# Altium PCB 400390.PcbDoc (part 5 of 5)
Units mm, origin at the board's own origin, x right, y up, seen from the top; angles counter-clockwise.
Board outline 50.8 x 50.4 mm, 4 copper layers (Top Layer, Mid Layer 1, Mid Layer 2, Bottom Layer), stack 1.507 mm thick; 262 components, 210 nets, 1216 pads, 1075 vias.
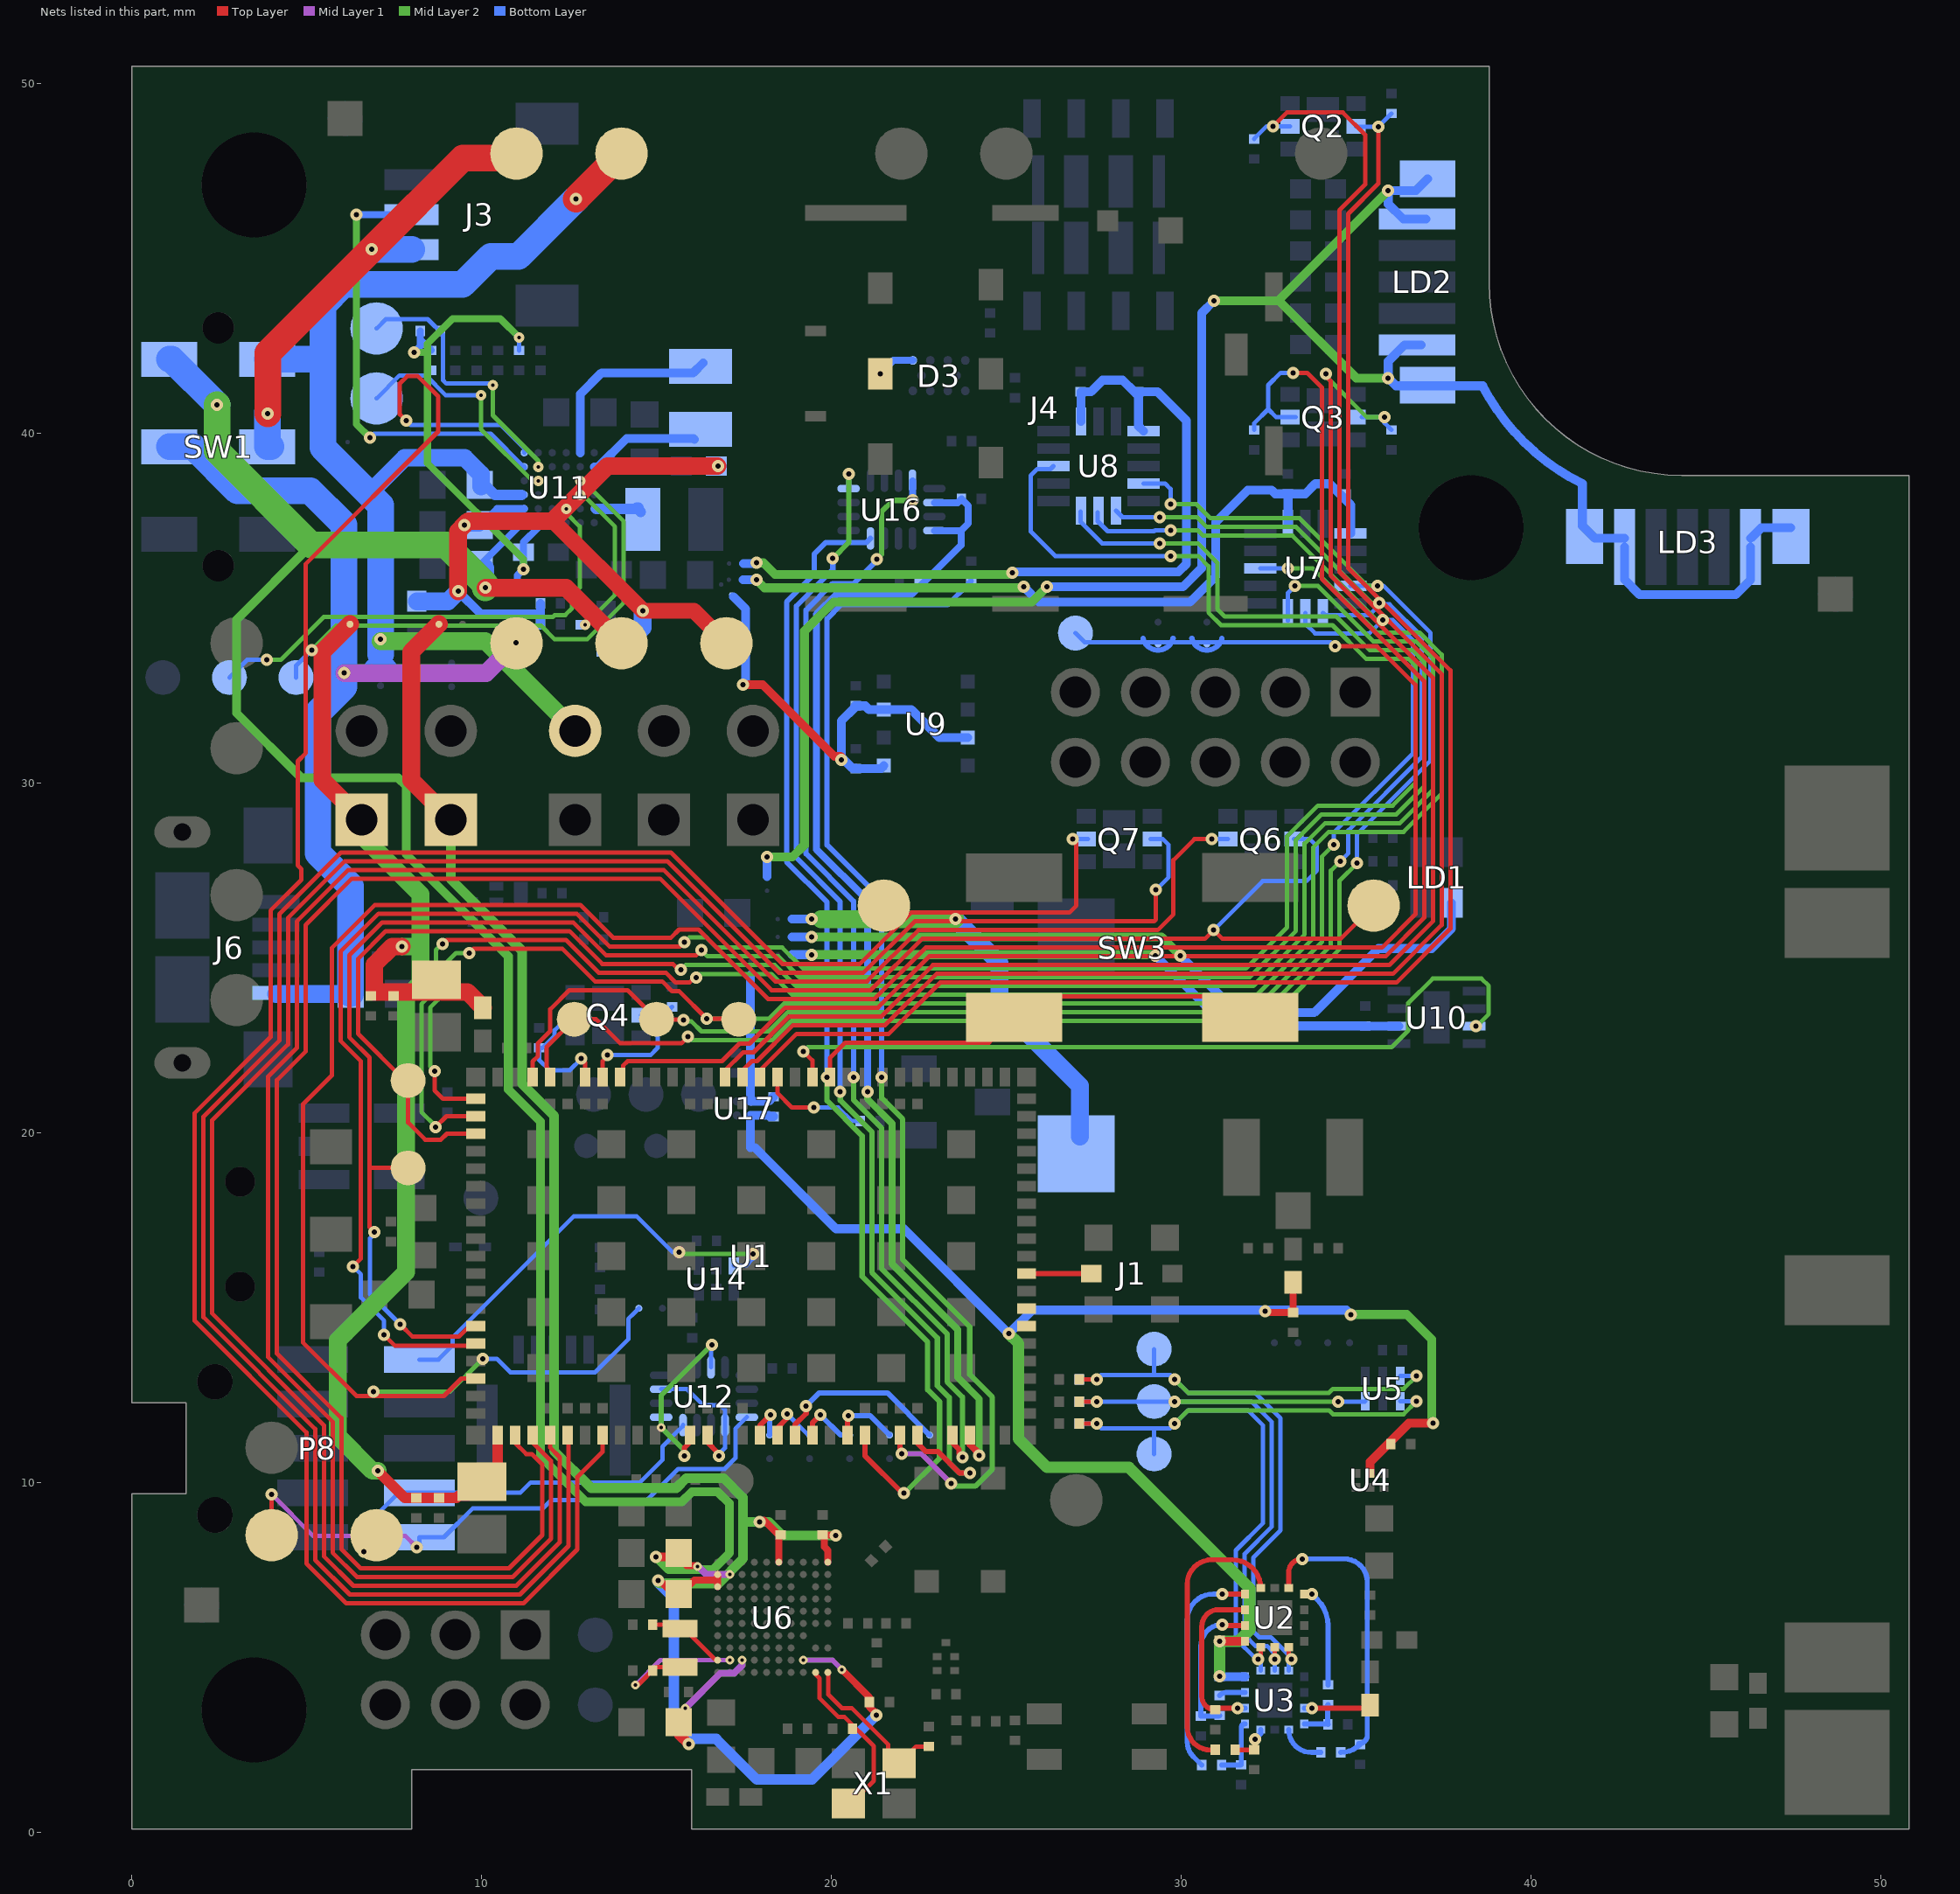
[diagram p6: the nets of this part, all layers, seen from the top]

## Via types
v1: diameter 0.35, hole 0.15, Top Layer to Bottom Layer, tented both sides, 535 vias
v2: diameter 0.35, hole 0.15, Top Layer to Mid Layer 1, tented both sides, 229 vias
v3: diameter 0.35, hole 0.15, Mid Layer 2 to Bottom Layer, tented both sides, 195 vias
v4: diameter 0.35, hole 0.15, Top Layer to Mid Layer 1, tented top, 48 vias
v5: diameter 0.25, hole 0.1, Top Layer to Mid Layer 1, tented both sides, 35 vias
v6: diameter 0.3, hole 0.1, Mid Layer 2 to Bottom Layer, tented both sides, 26 vias
v7: diameter 0.3, hole 0.1, Top Layer to Mid Layer 1, tented both sides, 3 vias
v8: diameter 0.25, hole 0.1, Mid Layer 2 to Bottom Layer, tented both sides, 2 vias
v9: diameter 0.61, hole 0.305, Top Layer to Bottom Layer, tented both sides, 2 vias

## Nets (pads, with @x,y where several pads share a name; then routed paths per layer and width w, separated by ;. In a path a pad name is that pad's centre, name@x,y a point inside that pad or via, vN(x,y) a via of type N, cw(c..) or ccw(c..) an arc to the next point about the centre after c; other vN are vias at no path point) (continued)
nRF91_SWDCLK: U1.33 U12.5 U12.11 | length 5.6
  Top Layer w0.15: v1(15.799,10.77) 15.799,10.996 15.956,11.154 U1.33@15.956,11.357
  Mid Layer 2 w0.15: v1(15.799,10.77) 15.799,10.918 v8(15.133,11.584) 15.133,12.491 v3(16.586,13.945) v3@16.637,13.945
  Bottom Layer w0.125: v8(15.133,11.584) U12.5@15.133,11.871 ; U12.11@16.558,13.296 v3@16.558,13.865
nRF91_SWDIO: U1.34 U12.1 U12.7 | length 4.1
  Top Layer w0.15: U1.34@16.456,11.357 16.456,11.154 16.761,10.849 v1@16.761,10.795
  Bottom Layer w0.125: U12.7@15.133,12.671 15.874,12.671 16.328,12.217 16.831,12.217 16.958,12.09 16.958,10.991 v1@16.761,10.795
  other v1: 16.787,10.77
P0.00: Q3.2 R44.2 U1.95 | length 45.6
  Top Layer w0.125: U1.95@13.956,21.597 14.043,21.684 14.043,21.922 14.176,22.055 16.874,22.055 17.374,22.555 17.658,22.555 18.685,23.581 21.33,23.581 22.8,25.05 35.843,25.05 36.944,26.151 36.944,32.913 34.023,35.834 34.023,41.309 33.6,41.732 v1(33.198,41.732)
  Bottom Layer w0.125: R44.2@32.09,40.097 32.09,40.294 32.487,40.691 ; v1(33.198,41.732) 32.842,41.732 32.487,41.377 32.487,40.691 ; Q3.2@33.269,40.462 Q3.2@33.106,40.462 32.715,40.462 32.487,40.691
P0.01: Q4.2 R45.2 U1.96 | length 4.1
  Top Layer w0.125: U1.96@13.456,21.597 13.456,22.048 13.602,22.194 v1(13.602,22.225)
  Bottom Layer w0.125: v1(13.602,22.225) 14.83,22.225 15.037,22.432 15.037,23.338 15.066,23.368 ; Q4.2@14.559,23.368 15.066,23.368 ; R45.2@15.448,23.606 15.21,23.368 15.066,23.368
P0.02: Q4.5 R46.2 U1.97 | length 3.9
  Top Layer w0.125: v1(12.852,22.123) 12.956,22.02 U1.97@12.956,21.597
  Bottom Layer w0.125: Q4.5@12.669,23.368 12.522,23.368 12.09,22.936 12.09,22.784 11.74,22.433 R46.2@11.653,22.433 11.653,22.078 11.938,21.793 12.522,21.793 v1(12.852,22.123)
P0.03: TP34.1 U1.99 U7.4 U8.4 | length 46.5
  Top Layer w0.125: U1.99@11.956,21.597 11.869,21.684 11.869,21.873 11.864,21.878 11.864,22.463 TP34.1@12.65,23.25 13.275,23.25 13.963,22.562 15.713,22.562 v1(15.9,22.75)
  Mid Layer 2 w0.125: v1(15.9,22.75) 15.996,22.654 18.31,22.654 18.859,23.203 32.474,23.203 34.528,25.257 34.528,27.213 v3(35.026,27.71) ; v3(29.693,37.974) 30.433,37.974 30.836,37.572 33.387,37.572 35.315,35.644 v3(35.611,35.644)
  Bottom Layer w0.125: U8.4@28.923,38.565 29.54,38.565 29.693,38.412 v3(29.693,37.974) ; U7.4@34.841,35.644 v3(35.611,35.644) 35.776,35.644 37.127,34.294 37.127,30.647 35.026,28.546 v3(35.026,27.71)
P0.04: TP35.1 U1.100 U7.6 U8.6 | length 48.4
  Top Layer w0.125: U1.100@11.456,21.597 11.456,22.042 11.613,22.199 11.613,22.567 11.963,22.917 11.963,22.964 ; 11.963,22.965 11.963,23.535 12.508,24.081 14.172,24.081 15,23.252 TP35.1@15,23.25 ; TP35.1@14.659,23.241 v1@15.723,23.241
  Mid Layer 2 w0.125: v1(15.775,23.225) 15.813,23.187 16,23.187 16.284,22.904 18.206,22.904 18.755,23.453 32.37,23.453 34.278,25.361 34.278,27.496 v3(34.544,27.762) ; v3(29.388,37.601) 30.453,37.601 30.732,37.322 33.283,37.322 35.455,35.15 v3@35.614,35.15
  Bottom Layer w0.125: U8.6@28.135,37.79 28.324,37.601 v3(29.388,37.601) ; U7.6@34.053,34.869 34.116,34.807 35.381,34.807 35.545,34.97 35.545,34.975 35.662,35.092 v3(35.662,35.153) 35.705,35.11 35.957,35.11 36.877,34.19 36.877,30.75 34.776,28.649 34.776,27.994 v3(34.544,27.762)
P0.05: TP36.1 U1.2 U7.7 U8.7 | length 56.1
  Top Layer w0.125: v1(8.661,21.768) 8.661,21.209 8.893,20.977 U1.2@9.836,20.977 ; v1(9.652,25.146) 9.774,25.268 12.306,25.268 13.244,24.331 15.164,24.331 15.446,24.049 15.651,24.049 v1(16.434,23.266) 17.334,23.266 TP36.1@17.35,23.25
  Mid Layer 2 w0.125: v1(8.661,21.768) 8.53,21.899 8.53,23.58 8.947,23.996 8.947,24.822 9.271,25.146 v1(9.652,25.146) ; v1(16.434,23.266) 18.215,23.266 18.651,23.703 32.266,23.703 34.028,25.464 34.028,27.907 v3(34.366,28.245) ; v3(29.693,37.228) 30.472,37.228 30.628,37.072 33.18,37.072 35.581,34.671
  Bottom Layer w0.125: U8.7@27.61,37.744 27.61,37.49 27.897,37.203 29.222,37.203 29.222,37.218 29.25,37.218 29.261,37.228 v3(29.693,37.228) ; U7.7@33.553,34.869 33.553,34.554 33.826,34.282 35.376,34.282 v3(35.765,34.671) 36.042,34.671 36.627,34.087 36.627,30.854 34.366,28.593 v3(34.366,28.245)
P0.06: U1.3 U7.11 | length 50.5
  Top Layer w0.125: v1(8.687,20.168) 8.996,20.477 U1.3@9.836,20.477 ; v1(8.89,25.406) 9.002,25.518 12.409,25.518 13.347,24.581 15.267,24.581 15.549,24.299 15.943,24.299 16.079,24.435 v1(16.129,24.435)
  Mid Layer 2 w0.125: v1(8.687,20.168) 8.687,20.193 8.28,20.599 8.28,23.683 8.697,24.1 8.697,25.232 8.89,25.425 v1(8.89,25.406) ; v1(16.129,24.435) 16.238,24.543 18.287,24.543 18.877,23.953 32.163,23.953 33.778,25.568 33.778,28.169 34.216,28.607 36.354,28.607 37.444,29.697 37.444,33.673 36.809,34.308 35.59,34.308 33.754,36.144 v3(33.045,36.144)
  Bottom Layer w0.125: U7.11@32.266,36.144 v3(33.045,36.144)
P0.07: TP37.1 U1.4 U7.8 | length 52.7
  Top Layer w0.125: TP37.1@7.808,21.5 6.468,22.839 6.468,24.975 7.262,25.768 12.513,25.768 13.451,24.831 15.469,24.831 15.636,24.663 v1(15.697,24.663) ; TP37.1@7.9,21.5 7.9,20.294 8.389,19.805 8.837,19.805 9.009,19.977 U1.4@9.836,19.977
  Mid Layer 2 w0.125: v1(15.697,24.663) 15.831,24.797 18.386,24.797 18.981,24.203 32.059,24.203 33.528,25.671 33.528,28.273 34.112,28.857 36.251,28.857 37.194,29.8 37.194,33.57 36.705,34.058 35.486,34.058 33.908,35.636 v3(33.249,35.636)
  Bottom Layer w0.125: U7.8@33.053,34.646 U7.8@33.053,34.869 33.053,35.441 v3(33.249,35.636)
P0.08: TP38.1 U1.15 U8.8 | length 66.6
  Top Layer w0.125: v1(6.934,17.17) 6.8,17.304 6.8,19 ; v1(7.671,14.529) 8.026,14.173 9.347,14.173 9.651,14.477 U1.15@9.836,14.477 ; TP38.1@7.9,19 6.8,19 ; v1(16.281,25.222) 16.14,25.081 13.554,25.081 12.616,26.018 7.158,26.018 6.218,25.079 6.218,22.735 6.8,22.154 6.8,19
  Mid Layer 2 w0.125: v1(16.281,25.222) 16.456,25.047 18.49,25.047 19.085,24.453 31.956,24.453 33.278,25.775 33.278,28.376 34.009,29.107 36.147,29.107 36.944,29.904 36.944,33.466 36.601,33.808 35.383,33.808 34.425,34.766 31.244,34.766 31.032,34.978 31.032,36.304 30.48,36.855 v3(29.388,36.855)
  Bottom Layer w0.125: v1(6.934,17.17) 6.934,17.11 6.81,16.986 6.81,15.389 v1(7.671,14.529) ; U8.8@27.127,37.77 27.127,37.465 27.737,36.855 v3(29.388,36.855)
P0.09: U1.16 U8.11 | length 69.3
  Top Layer w0.125: v1(6.327,16.182) 6.55,16.405 6.55,22.05 5.968,22.632 5.968,25.182 7.055,26.268 12.72,26.268 13.658,25.331 15.679,25.331 v1(15.799,25.451) ; v1(7.214,14.224) 7.518,13.919 9.778,13.919 U1.16@9.836,13.977
  Mid Layer 2 w0.125: v1(15.799,25.451) 15.933,25.585 16.432,25.585 16.719,25.297 18.593,25.297 19.188,24.703 31.852,24.703 33.028,25.878 33.028,28.48 33.905,29.357 36.044,29.357 36.694,30.007 36.694,33.363 36.498,33.558 35.279,33.558 34.322,34.516 31.141,34.516 30.782,34.874 30.782,36.2 30.489,36.493 v3(29.7,36.493)
  Bottom Layer w0.125: v1(6.327,16.182) 6.553,15.956 6.553,15.293 7.214,14.632 v1(7.214,14.224) ; U8.11@26.348,39.065 26.26,38.978 25.883,38.978 25.698,38.793 25.698,37.193 26.398,36.493 v3(29.7,36.493)
P0.10: SB5.1 SB6.1 SB14.1 TP7.1 U1.18 | length 77.3
  Top Layer w0.125: U1.18@9.836,12.977 9.421,12.977 8.921,12.477 6.426,12.477 4.903,14 4.903,20.826 5.722,21.645 5.722,21.994 5.718,21.998 5.718,25.286 6.951,26.518 12.824,26.518 13.761,25.581 15.416,25.581 15.649,25.813 16.203,25.813 18.186,23.831 21.227,23.831 22.696,25.3 35.739,25.3 36.694,26.254 36.694,32.809 35.594,33.909 v1(34.392,33.909)
  Mid Layer 2 w0.125: v1(6.909,12.598) 9.093,12.598 v3(10.033,13.538)
  Bottom Layer w0.125: v3(10.033,13.538) 10.439,13.538 10.82,13.157 13.249,13.157 14.192,14.1 14.192,14.682 14.347,14.837 SB14.1@14.496,14.986 ; TP7.1@26.975,34.29 27.233,34.032 28.948,34.032 29.726,34.032 30.345,34.032 31.123,34.032 34.269,34.032 v1(34.392,33.909)
P0.13/AIN0: Q6.2 TP32.1 U1.23 | length 67.3
  Top Layer w0.125: U1.23@10.956,11.357 10.956,11.142 11.278,10.82 11.434,10.82 11.736,10.519 11.736,8.502 10.787,7.553 6.544,7.553 5.994,8.103 5.994,11.848 4.153,13.689 4.153,21.509 4.968,22.325 4.968,25.942 6.295,27.268 15.101,27.268 18.289,24.081 21.123,24.081 22.593,25.55 30.675,25.55 v1(30.925,25.8) 31.175,25.55 34.55,25.55 TP32.1@35.5,26.5
  Bottom Layer w0.125: v1(30.925,25.8) 32.325,27.2 33.575,27.2 33.875,27.5 33.875,28.2 33.675,28.4 Q6.2@33.22,28.4
P0.14/AIN1: Q6.5 U1.24 | length 60.4
  Top Layer w0.125: U1.24@11.456,11.357 11.456,11.152 11.986,10.622 11.986,8.398 10.891,7.303 6.44,7.303 5.744,7.999 5.744,11.744 3.903,13.586 3.903,21.613 4.718,22.428 4.718,26.046 6.191,27.518 15.205,27.518 18.393,24.331 21.02,24.331 22.489,25.8 29.325,25.8 29.775,26.25 29.775,27.8 30.375,28.4 v1(30.875,28.4)
  Bottom Layer w0.125: v1(30.875,28.4) Q6.5@31.33,28.4
P0.15/AIN2: Q7.2 U1.25 | length 61.6
  Top Layer w0.125: U1.25@11.956,11.357 11.956,11.006 12.236,10.726 12.236,8.295 10.994,7.053 6.337,7.053 5.494,7.895 5.494,11.641 2.3,14.835 2.3,20.363 4.468,22.532 4.468,26.149 6.088,27.768 15.308,27.768 18.496,24.581 20.916,24.581 22.385,26.05 29.221,26.05 29.275,26.104 v1(29.275,26.95)
  Bottom Layer w0.125: Q7.2@29.12,28.4 Q7.2@29.17,28.4 29.475,28.4 29.638,28.238 29.638,27.313 v1(29.275,26.95)
P0.16/AIN3: Q7.5 TP33.1 U1.26 | length 60
  Top Layer w0.125: U1.26@12.456,11.357 12.486,11.327 12.486,8.191 11.098,6.803 6.233,6.803 5.244,7.792 5.244,11.537 2.05,14.732 2.05,20.467 4.218,22.636 4.218,26.253 5.984,28.018 15.412,28.018 18.6,24.831 20.812,24.831 22.282,26.3 26.8,26.3 27,26.5 27,28.275 v1@26.875,28.4
  Bottom Layer w0.125: v1@26.875,28.4 v1(26.9,28.4) Q7.5@27.28,28.4 Q7.5@27.33,28.4
P0.17/AIN4: U1.28 U11.A6 | length 56.5
  Top Layer w0.125: v1(7.849,40.361) 7.664,40.545 7.664,41.425 7.876,41.638 8.177,41.638 8.759,41.055 8.759,40.051 4.978,36.271 4.978,30.859 4.747,30.628 4.747,27.647 4.853,27.541 4.853,27.24 3.968,26.356 3.968,22.739 1.8,20.571 1.8,14.628 4.994,11.434 4.994,7.688 6.13,6.553 11.201,6.553 12.736,8.088 12.736,10.159 13.456,10.879 U1.28@13.456,11.357
  Bottom Layer w0.125: v1(7.849,40.361) 7.97,40.239 10.555,40.239 11.221,39.573 U11.A6@11.221,39.446
P0.21: SB7.2 U1.37 | length 1.3
  Top Layer w0.152: U1.37@17.956,11.357 17.956,11.636 v1(18.261,11.941)
  Bottom Layer w0.152: SB7.2@18.235,11.361 18.235,11.916 v1(18.261,11.941)
P0.22: SB8.2 U1.38 | length 1.6
  Top Layer w0.152: U1.38@18.456,11.357 18.456,11.562 18.735,11.841 v1(18.735,11.967)
  Bottom Layer w0.125: v1(18.735,11.967) 19.341,11.361 SB8.2@19.378,11.361
P0.23: SB9.2 U1.39 | length 5.2
  Top Layer w0.152: U1.39@18.956,11.357 18.956,11.655 19.279,11.978 v1(19.279,12.192) v1@19.279,12.217
  Bottom Layer w0.152: v1(19.279,12.192) 19.655,12.568 21.6,12.568 SB9.2@22.807,11.361
P0.24: SB10.2 U1.40 | length 1.8
  Top Layer w0.152: U1.40@19.456,11.357 19.456,11.709 v1(19.685,11.938)
  Bottom Layer w0.152: v1(19.685,11.938) 20.262,11.361 SB10.2@20.521,11.361
P0.25: SB11.2 U1.42 | length 2
  Top Layer w0.152: U1.42@20.456,11.357 20.456,11.89 v1(20.481,11.916)
  Bottom Layer w0.152: v1(20.481,11.916) 21.109,11.916 SB11.2@21.664,11.361
P0.26: SW3.2 U1.83 | length 13.5
  Top Layer w0.125: U1.83@19.956,21.597 19.956,22.14 20.396,22.581 24.506,22.581 25.826,23.901 31.374,23.901 SW3.2@31.975,23.3
P0.27: U1.84 U10.7 | length 23.1
  Top Layer w0.125: v1(19.202,22.326) 19.456,22.072 U1.84@19.456,21.597
  Mid Layer 2 w0.125: v1(19.202,22.326) 19.328,22.453 36.016,22.453 36.487,22.924 36.487,23.711 37.189,24.412 38.582,24.412 38.788,24.206 38.788,23.4 38.438,23.05 v3(38.426,23.05)
P0.28: R21.2 U1.86 | length 3.2
  Top Layer w0.125: U1.86@18.456,21.597 18.456,21.143 18.874,20.725 v1(19.5,20.725)
  Bottom Layer w0.125: v1(19.5,20.725) 20.194,20.725 20.574,20.345 R21.2@20.822,20.345
P0.29: Q2.5 R41.2 U1.87 | length 47.3
  Top Layer w0.125: U1.87@17.956,21.597 U1.87@17.956,21.782 ; U1.87@17.956,21.791 U1.87@17.956,21.782 ; v3(35.636,48.768) 35.636,47.142 34.773,46.279 34.773,36.144 37.694,33.223 37.694,25.84 36.154,24.3 23.11,24.3 21.641,22.831 19.004,22.831 U1.87@17.956,21.782
  Bottom Layer w0.125: Q2.5@34.996,48.781 35.009,48.768 v3(35.636,48.768) 35.636,48.77 R41.2@36.012,49.146
  other v1: 35.636,48.768
P0.30: Q2.2 R42.2 U1.88 | length 50.2
  Top Layer w0.125: U1.88@17.456,21.597 17.456,21.782 17.728,22.055 17.875,22.055 18.901,23.081 21.537,23.081 23.007,24.55 36.05,24.55 37.444,25.944 37.444,33.12 34.523,36.041 34.523,46.382 35.255,47.115 35.255,48.539 34.62,49.174 33.02,49.174 v1(32.626,48.781)
  Bottom Layer w0.125: R42.2@32.08,48.418 32.443,48.781 v1(32.626,48.781) Q2.2@33.106,48.781
P0.31: Q3.5 R43.2 U1.89 | length 42.5
  Top Layer w0.125: U1.89@16.956,21.597 16.956,21.783 17.478,22.305 17.771,22.305 18.797,23.331 21.434,23.331 22.903,24.8 35.946,24.8 37.194,26.047 37.194,33.016 34.273,35.937 34.273,41.496 v1@34.061,41.707
  Mid Layer 2 w0.125: v1@34.061,41.707 35.306,40.462 v3(35.814,40.462)
  Bottom Layer w0.125: Q3.5@35.159,40.462 v3(35.814,40.462) 35.814,40.295 R43.2@36.012,40.097
  other v1: 34.138,41.707
PGOOD1: R27.2 TP20.1 U11.B5 | length 7.8
  Mid Layer 2 w0.125: v6(10.323,41.374) 10.323,40.514 11.621,39.216 v6(11.621,39.046)
  Bottom Layer w0.125: TP20.1@7,43 7.264,43.264 8.462,43.264 8.903,42.823 8.903,41.516 8.994,41.425 10.272,41.425 v6(10.323,41.374)
PGOOD2: R28.2 TP21.1 U11.C5 | length 6.7
  Mid Layer 2 w0.125: v6(9.985,41.088) 9.985,40.111 11.45,38.646 v6(11.621,38.646)
  Bottom Layer w0.125: TP21.1@7,41 7.656,41.656 8.409,41.656 8.978,41.088 v6(9.985,41.088)
R\E\S\E\T\: TP23.1 U11.E3 | length 13.7
  Mid Layer 2 w0.125: v3(3.861,33.528) 4.265,33.528 5.488,34.751 12.035,34.751 12.09,34.806 12.391,34.806 12.589,35.004 12.589,35.373 12.805,35.589 12.805,37.336 12.421,37.72 v6(12.421,37.846)
  Bottom Layer w0.125: TP23.1@2.794,33.02 3.302,33.528 v3(3.861,33.528)
RESET: P8.10 U14.3 | length 12.6
  Mid Layer 2 w0.125: v3(15.646,16.586) 15.697,16.535 v3(17.755,16.535)
  Bottom Layer w0.125: P8.10@8.225,13.52 8.77,13.52 9.169,13.919 9.169,14.146 12.633,17.609 14.44,17.609 15.463,16.586 v3(15.646,16.586) ; U14.3@17.213,16.199 17.545,16.199 17.755,16.408 v3(17.755,16.535)
RF: J1.1 U1.61 | length 1.9
  Top Layer w0.146: U1.61@25.576,15.977 J1.1@27.429,15.977
RF_SW1: R1.2 R6.2 TP2.1 U2.7 U3.7 U5.6 | length 23.9
  Top Layer w0.125: R1.2@27.082,12.954 v1(27.584,12.954) ; U2.7@33.071,5.299 33.071,5.033 v1(33.147,4.957)
  Mid Layer 2 w0.125: v3(29.812,12.954) 30.197,12.569 34.222,12.569 34.335,12.682 36.357,12.682 v3(36.725,13.05)
  Bottom Layer w0.125: R6.2@27.082,12.954 v1(27.584,12.954) 27.711,13.081 29.225,13.081 ; TP2.1@29.225,13.819 29.225,13.081 ; 32.111,12.569 30.197,12.569 v3(29.812,12.954) 29.685,13.081 29.225,13.081 ; 32.111,12.569 32.839,11.841 32.839,8.639 32.059,7.858 32.059,5.743 32.221,5.581 32.559,5.581 33.147,4.993 v1(33.147,4.957) 33.071,4.88 U3.7@33.071,4.626 ; U5.6@36.258,13.051 U5.6@36.258,13.051 v3(36.725,13.05)
RF_SW2: R2.2 R5.2 TP3.1 U2.6 U3.6 U5.3 | length 20
  Top Layer w0.125: R2.2@27.082,12.319 v1(27.584,12.319) ; v1(32.671,4.957) U2.6@32.671,5.299
  Mid Layer 2 w0.125: v3(29.812,12.319) v3(34.485,12.319)
  Bottom Layer w0.125: R5.2@27.082,12.319 v1(27.584,12.319) TP3.1@29.225,12.319 32.008,12.319 32.589,11.738 32.589,8.742 31.809,7.961 31.809,5.64 32.117,5.331 32.456,5.331 32.671,5.116 v1(32.671,4.957) U3.6@32.671,4.626 ; v3(34.485,12.319) 35.251,12.319 U5.3@35.258,12.326
RF_SW3: R3.2 R4.2 TP4.1 U2.5 U3.5 U5.1 | length 22.7
  Top Layer w0.125: R3.2@27.082,11.684 v1(27.584,11.684) ; v1(32.195,4.957) 32.271,5.033 U2.5@32.271,5.299
  Mid Layer 2 w0.125: v3(29.812,11.684) 30.197,12.069 34.222,12.069 34.335,11.956 36.355,11.956 v3(36.724,12.326)
  Bottom Layer w0.125: R4.2@27.082,11.684 v1(27.584,11.684) 27.711,11.557 29.225,11.557 ; TP4.1@29.225,10.819 29.225,11.557 ; U3.5@32.271,4.626 32.271,4.88 v1(32.195,4.957) 32.138,4.957 31.559,5.536 31.559,8.065 32.339,8.846 32.339,11.634 31.905,12.069 30.196,12.069 v3(29.812,11.684) 29.685,11.557 29.225,11.557 ; U5.1@36.258,12.326 v3(36.724,12.326)
RST: D3.C1 J4.C2 | length 1.1
  Bottom Layer w0.203: v1(21.394,41.708) 21.772,42.086 D3.C1@22.328,42.086
SCLK: U1.58
SDATA: U1.59 | length 0
SIM_1V8: C34.2 R49.2 U1.49 U16.14 U16.16 | length 34.7
  Top Layer w0.2: U1.49@23.956,11.357 23.956,11.094 v1@24.25,10.8
  Mid Layer 2 w0.2: v3(21.031,21.184) 21.031,20.972 21.735,20.268 21.735,16.251 23.608,14.378 23.608,13.011 24.225,12.395 v1(24.225,10.775)
  Bottom Layer w0.2: v3(21.031,21.184) 21.032,26.65 19.576,28.106 19.576,34.824 20.155,35.404 22.303,35.404 23.708,36.808 23.708,37.221 ; U16.16@22.942,37.221 23.708,37.221 ; U16.14@22.942,38.021 23.613,38.021 C34.2@23.718,38.125 23.91,37.934 23.91,37.423 23.708,37.221
SIM_CLK: U1.46 U16.8 | length 34
  Top Layer w0.152: U1.46@22.456,11.357 22.456,11.139 22.709,10.886 23.05,10.886 23.662,10.274 v1(23.957,10.274) ; v1@23.957,10.325 v1@24.008,10.325
  Mid Layer 2 w0.152: v3(20.041,36.424) 20.498,36.881 v3(20.498,38.837) ; v3(20.253,21.184) 20.253,20.932 21.156,20.029 21.156,16.012 23.03,14.138 23.03,12.772 23.368,12.433 23.368,10.568 23.662,10.274 v1(23.957,10.274) ; v1@23.957,10.325 v1@24.008,10.325
  Bottom Layer w0.152: v3(20.041,36.424) 20.041,36.107 18.997,35.064 18.997,27.866 20.25,26.613 v3@20.25,21.184 ; U16.8@20.492,38.421 20.498,38.426 v3(20.498,38.837)
SIM_DET: R52.2 U1.45 | length 34.6
  Top Layer w0.152: U1.45@21.956,11.357 21.956,10.915 v2@22.047,10.824
  Mid Layer 1 w0.152: v2(22.015,10.824) 22.577,10.824 v1(23.419,9.982)
  Mid Layer 2 w0.152: v3(21.438,21.59) 21.438,20.991 22.036,20.393 22.036,16.376 23.954,14.458 23.954,13.092 24.601,12.445 24.601,10.386 24.113,9.898 23.503,9.898 v1(23.419,9.982)
  Bottom Layer w0.152: v3(21.438,21.59) 21.438,26.67 19.877,28.231 19.877,34.7 20.28,35.103 23.323,35.103 23.921,35.701 23.921,35.716 23.98,35.775 R52.2@23.995,35.775
SIM_IO: U1.48 U16.12 | length 32.3
  Top Layer w0.152: U1.48@23.456,11.357 23.456,11.144 23.643,10.957 v1@23.643,10.825
  Mid Layer 2 w0.152: v3(20.632,21.59) 20.632,20.945 21.434,20.143 21.434,16.127 23.307,14.253 23.307,12.887 23.745,12.449 v1(23.745,10.723) ; v3(21.295,36.402) 21.433,36.54 21.433,37.757 21.76,38.084 v3(22.317,38.084)
  Bottom Layer w0.152: v3(20.632,21.59) 20.632,26.624 19.275,27.981 19.275,34.949 20.031,35.705 20.643,35.705 21.295,36.357 v3(21.295,36.402)
  Bottom Layer w0.2: v3(22.317,38.084) U16.12@22.317,38.646
SIM_RST: U1.43 U16.4 | length 33.5
  Top Layer w0.152: U1.43@20.956,11.357 20.956,10.77 22.023,9.703 v1(22.073,9.703)
  Mid Layer 2 w0.152: v3(19.874,21.59) v3@19.874,21.488 ; v3@19.976,21.59 v3@19.874,21.488 ; v1(22.073,9.703) 22.096,9.703 23.091,10.698 23.091,12.318 22.752,12.657 22.752,14.023 20.879,15.897 20.879,19.914 19.874,20.918 v3@19.874,21.488
  Bottom Layer w0.152: v3(19.874,21.59) 19.874,26.597 18.72,27.751 18.72,35.179 19.507,35.966 19.507,36.551 19.837,36.881 21.002,36.881 U16.4@21.117,36.996
STP: TP22.1 U11.C2 | length 14.8
  Mid Layer 2 w0.125: v3(5.147,33.807) 5.841,34.501 11.701,34.501 12.082,34.121 13.026,34.121 14.064,35.158 14.064,37.48 12.898,38.646 v6(12.821,38.646)
  Bottom Layer w0.125: TP22.1@4.699,33.02 4.699,33.359 v3(5.147,33.807)
SW1: L13.1 U11.E1 | length 1.4
  Bottom Layer w0.3: U11.E1@13.271,37.846 L13.1@14.431,37.846 ; L13.1@14.481,37.871 14.431,37.871 L13.1@14.551,37.751
SW2A: L14.1 U11.B1 | length 3.2
  Bottom Layer w0.254: U11.B1@13.225,39.036 13.331,39.036 14.148,39.853 16.059,39.853 L14.1@16.081,39.83
SW2B: L14.2 U11.A2 | length 5.6
  Bottom Layer w0.152: U11.A2@12.802,39.443 U11.A2@12.802,39.446
  Bottom Layer w0.25: U11.A2@12.821,39.446 12.821,41.123 13.43,41.732 16.053,41.732 L14.2@16.332,42.012
SWDCLK: P8.4 TP29.1 U12.4 | length 11.3
  Bottom Layer w0.125: v1(6.629,8.026) 6.629,8.712 7.627,9.71 P8.4@8.225,9.71 11.107,9.71 11.405,10.008 14.529,10.008 15.168,10.647 15.168,11.028 15.758,11.617 U12.4@15.758,11.646
SWDIO: P8.2 TP27.1 U12.16 | length 17.8
  Top Layer w0.125: TP27.1@4,8.192 TP27.1@4,8.5 v2(4,9.665)
  Mid Layer 1 w0.125: v2(4,9.665) 5.182,8.484 7.819,8.484 v1(8.149,8.153)
  Bottom Layer w0.125: P8.2@8.225,8.179 P8.2@8.225,8.44 8.923,8.44 9.754,9.271 11.76,9.271 11.997,9.508 14.736,9.508 15.617,10.389 16.942,10.389 17.256,10.703 17.256,11.545 U12.16@17.583,11.871
T1A: L7.2 R10.1 U3.14 | length 1.2
  Top Layer w0.146: R10.1@31.539,2.359 32.098,2.359 32.112,2.373 v1(32.112,2.664)
  Bottom Layer w0.146: v1(32.112,2.664) 32.271,2.823 U3.14@32.271,2.936
T1F: R10.2 U2.14 | length 8.2
  Top Layer w0.146: R10.2@30.969,2.359 30.831,2.359 cw(c30.831,3.019) 30.171,3.019 30.171,7.098 cw(c30.868,7.098) 30.868,7.795 31.465,7.795 cw(c31.465,6.989) U2.14@32.271,6.989
T2A: C10.1 L6.2 U3.1 | length 1.8
  Bottom Layer w0.146: C10.1@31.153,1.927 31.7,1.927 L6.2@31.706,1.933 ; L6.2@31.706,1.933 ccw(c31.679,1.96) 31.717,1.96 31.717,2.997 cw(c31.826,2.997) U3.1@31.826,3.106
T2F: C10.2 U2.1 | length 6.4
  Top Layer w0.146: v1(31.172,6.819) U2.1@31.826,6.819
  Bottom Layer w0.146: C10.2@30.583,1.927 30.346,2.163 cw(c30.77,2.588) 30.171,2.588 30.171,6.067 cw(c30.922,6.067) 30.922,6.819 v1(31.172,6.819)
T3F: C12.2 U2.2 U3.2 | length 5
  Top Layer w0.146: v1(31.608,3.556) 31.018,3.556 ccw(c31.018,3.508) C12.2@30.969,3.508 cw(c30.969,3.889) 30.588,3.889 30.588,5.89 cw(c31.067,5.89) 31.067,6.369 U2.2@31.826,6.369
  Bottom Layer w0.146: v1(31.608,3.556) U3.2@31.826,3.556
T4A: C9.1 U3.3 | length 0.8
  Bottom Layer w0.146: C9.1@31.096,3.914 cw(c31.319,3.691) 31.203,3.984 cw(c31.319,3.691) 31.319,4.006 U3.3@31.826,4.006
T4F: C9.2 L4.2 U2.3 | length 4.2
  Top Layer w0.146: v1@31.172,5.919 U2.3@31.826,5.919
  Bottom Layer w0.146: C9.2@31.096,3.344 cw(c31.062,3.378) 31.062,3.33 L4.2@30.563,3.33 30.563,5.334 cw(c31.172,5.334) v1(31.172,5.944)
T5A: C11.1 U3.12 | length 1.3
  Bottom Layer w0.146: U3.12@33.071,2.936 ccw(c33.721,2.936) 33.721,2.287 C11.1@33.989,2.287
T5F: C11.2 L5.2 U2.12 | length 8.7
  Top Layer w0.146: U2.12@33.071,6.989 33.071,7.433 cw(c33.458,7.433) v1(33.458,7.82)
  Bottom Layer w0.146: v1(33.458,7.82) 34.66,7.82 cw(c34.66,7.161) 35.318,7.161 35.318,2.78 cw(c35.075,2.78) L5.2@35.075,2.537 ; C11.2@34.559,2.287 ccw(c34.559,3.067) 35.111,2.515 L5.2@35.113,2.517
T6A: C14.2 R9.1 U3.11 | length 1.2
  Bottom Layer w0.146: U3.11@33.516,3.106 34.179,3.106 C14.2@34.189,3.096 ; C14.2@34.195,3.09 C14.2@34.189,3.096 ; R9.1@34.195,3.649 34.189,3.643 C14.2@34.189,3.096
T6F: R9.2 U2.11 | length 3
  Top Layer w0.146: U2.11@33.516,6.819 v1(33.734,6.819)
  Bottom Layer w0.146: v1(33.734,6.819) 33.882,6.671 cw(c33.126,5.915) 34.195,5.915 R9.2@34.195,4.219
T7A: L3.2 U3.10 | length 1.9
  Top Layer w0.146: v1(33.734,3.556) L3.2@35.395,3.556
  Bottom Layer w0.146: U3.10@33.516,3.556 v1(33.734,3.556)
THR: J3.2 U11.B6 | length 13.2
  Mid Layer 2 w0.2: v3(6.426,46.253) 6.426,40.259 v3(6.807,39.878)
  Bottom Layer w0.125: v3(6.807,39.878) 6.918,39.989 10.264,39.989 11.207,39.046 U11.B6@11.221,39.046
  Bottom Layer w0.152: U11.B6@11.207,39.046 11.193,39.046 U11.B6@11.218,39.021
  Bottom Layer w0.2: v3(6.426,46.253) J3.2@8.153,46.253
VBUS: C33.1 C53.2 SW1.3 TP12.1 U6.J9 U11.F6 | length 64.1
  Top Layer w0.2: C33.1@15.638,7.86 15.866,7.631 v5@16.17,7.631
  Top Layer w0.254: v1(14.986,7.874) 15.623,7.874 C33.1@15.638,7.86
  Top Layer w0.508: v1(10.109,35.585) 12.415,35.585 TP12.1@14,34
  Mid Layer 1 w0.2: v5@16.17,7.631 16.425,7.376 v5(17.097,7.376)
  Mid Layer 2 w0.254: 5.131,36.805 2.997,34.671 2.997,32.004 4.851,30.15 7.62,30.15 7.849,29.921 7.849,27.965 10.768,25.046 10.768,21.241 11.684,20.324 11.684,10.744 12.973,9.455 15.729,9.455 16.011,9.737 16.755,9.737 17.084,9.408 17.084,7.986 16.61,7.512 15.348,7.512 v1(14.986,7.874)
  Mid Layer 2 w0.762: v1(2.438,40.818) 2.438,39.497 5.131,36.805 8.992,36.805 10.109,35.687 v1(10.109,35.585)
  Bottom Layer w0.203: C53.2@9.949,36.236 C53.2@9.965,36.236 ; C53.2@9.957,36.228 C53.2@9.965,36.236 ; C53.2@10.067,36.236 C53.2@9.965,36.236 ; U11.F6@11.221,37.446 11.175,37.446 C53.2@9.965,36.236
  Bottom Layer w0.508: v1(10.109,35.585) C53.2@10.109,36.152
  Bottom Layer w0.762: SW1.3@1.075,42.12 1.136,42.12 v1(2.438,40.818)
  other v5: 16.17,7.606
VBUS': C43.1 C44.1 J6.1 SW1.2 TP11.1 | length 27.4
  Mid Layer 1 w0.508: v1(6.071,33.147) 10.126,33.147 v2(10.989,34.011)
  Bottom Layer w0.508: J6.1@4.125,23.975 C43.1@6.237,23.975
  Bottom Layer w0.762: SW1.2@1.075,39.62 1.757,39.62 3.023,38.354 5.105,38.354 6.071,37.389 v1(6.071,33.147) 6.071,32.764 5.323,32.016 5.323,27.996 6.256,27.063 6.259,27.063 C43.1@6.259,23.978
VDD: C52.2 R27.1 R28.1 R33.2 R34.1 U11.F5 | length 14.6
  Mid Layer 2 w0.203: v3(8.077,42.316) 8.428,42.316 8.453,42.342 ; v6(11.078,42.739) 10.535,43.282 9.169,43.282 8.453,42.566 8.453,42.342 ; v3(11.201,36.119) 11.201,36.398 8.453,39.146 8.453,42.342
  Bottom Layer w0.125: R33.2@11.078,42.369 v6(11.078,42.739)
  Bottom Layer w0.203: v3(8.077,42.316) 8.249,42.489 8.249,42.683 ; R27.1@8.249,42.926 8.249,42.683 ; R28.1@8.56,42.373 8.249,42.683 ; R34.1@11.018,35.687 11.018,35.935 v3(11.201,36.119) 11.201,36.6 11.201,36.888 11.621,37.308 U11.F5@11.621,37.446
VDD_ADXL362: C38.2 C39.2 ST8.2 U8.1 U8.14 | length 22.7
  Mid Layer 2 w0.254: v3(17.856,36.297) 18.059,36.297 18.392,35.964 25.119,35.964 v3(25.171,36.017)
  Bottom Layer w0.254: ST8.2@17.483,36.279 v3@17.818,36.279 ; v3@25.171,36.043 29.921,36.043 30.15,36.271 30.15,40.361 29.317,41.193 C39.2@28.778,41.193 C39.2@28.651,41.193 ; U8.14@27.135,40.34 C38.2@27.135,41.185 ; C38.2@27.135,41.193 27.426,41.193 27.754,41.521 28.323,41.521 C39.2@28.651,41.193 ; U8.1@28.923,40.065 28.778,40.21 28.778,41.066 C39.2@28.651,41.193
VDD_ADXL372: C36.2 C37.2 ST7.2 U7.1 U7.14 | length 22
  Mid Layer 2 w0.254: v3(17.856,35.814) 18.085,35.585 25.476,35.585 v3(25.502,35.611)
  Bottom Layer w0.254: ST7.2@17.475,35.814 v3(17.856,35.814) ; v3(25.502,35.611) 25.933,35.179 30.251,35.179 30.988,35.916 30.988,37.465 31.898,38.375 32.587,38.375 32.69,38.272 C36.2@33.045,38.272 ; U7.14@33.053,37.419 33.053,38.264 C36.2@33.045,38.272 ; U7.1@34.841,37.144 34.841,37.955 34.239,38.557 33.833,38.557 33.548,38.272 C36.2@33.045,38.272
VDD_BH: C42.2 ST2.2 U10.2 | length 18.2
  Mid Layer 2 w0.254: v3(19.431,25.095) 29.235,25.095 v3(29.261,25.07)
  Bottom Layer w0.254: ST2.2@18.872,25.095 v3(19.431,25.095) ; v3(29.261,25.07) 31.273,23.058 C42.2@35.255,23.058 ; C42.2@35.255,23.05 U10.2@36.225,23.05
VDD_BME: C40.2 C41.2 ST9.2 U9.2 U9.6 U9.8 | length 13
  Top Layer w0.254: v1(17.475,32.817) 18.035,32.817 20.086,30.765 20.264,30.765 v1@20.282,30.747
  Bottom Layer w0.254: 17.196,35.331 17.551,34.976 17.551,32.893 v1(17.475,32.817) ; U9.8@21.5,30.5 21.415,30.415 C41.2@20.7,30.415 20.692,30.423 20.606,30.423 20.282,30.747 20.282,31.779 20.677,32.173 20.677,32.207 20.685,32.215 C40.2@20.7,32.215 20.708,32.207 20.968,32.207 21.075,32.1 U9.6@21.5,32.1 22.289,32.1 23.089,31.3 U9.2@23.9,31.3
  other v1: 20.282,30.671
VDD_BZR: Bz1.1 D2.1 ST5.2 | length 12.8
  Mid Layer 2 w0.254: v3(19.431,26.111) 19.706,26.111
  Mid Layer 2 w0.508: 19.706,26.111 v3(23.546,26.111)
  Bottom Layer w0.254: ST5.2@18.872,26.111 v3(19.431,26.111) ; D2.1@24.8,23.222 D2.1@24.8,23.65
  Bottom Layer w0.508: v3(23.546,26.111) 24.8,24.857 24.8,23.65 27.1,21.35 Bz1.1@27.1,19.9
VDD_LW: LD2.1 LD2.2 LD2.6 LD3.1 LD3.2 LD3.6 ST4.2 | length 59.2
  Mid Layer 2 w0.254: v3(18.161,27.889) 18.887,27.889 19.228,28.23 19.228,34.346 20.061,35.179 25.73,35.179 v3(26.162,35.611) ; v3(30.937,43.79) 32.766,43.79 ; v3(35.916,41.58) 35.001,41.58 32.791,43.79 32.766,43.79 ; v3(35.916,46.939) 32.766,43.79
  Bottom Layer w0.254: ST4.2@18.161,27.33 v3(18.161,27.889) ; v3(26.162,35.611) 30.048,35.611 30.582,36.144 30.582,43.434 v3(30.937,43.79) ; LD2.6@36.864,42.528 36.381,42.528 35.916,42.062 v3(35.916,41.58) 36.138,41.358 38.616,41.358 ccw(c44.3,44.3) 41.467,38.56 41.467,37.358 41.825,37 LD3.2@42.675,37 ; LD2.2@36.992,46.128 36.346,46.128 35.916,46.558 v3(35.916,46.939) 36.703,46.939 LD2.1@37.042,47.278 ; LD3.2@42.675,36.75 42.675,35.815 43.104,35.386 45.847,35.386 46.275,35.814 LD3.6@46.275,36.75 ; LD3.6@46.275,37 46.575,37.3 LD3.1@47.425,37.3
VDD_nRF52: C22.1 C23.1 C24.1 C26.1 C27.1 P2.1 SB4.1 U6.B3 U6.B8 U6.H10 U6.J10 U6.K1 U6.K5 | length 61.7
  Top Layer w0.2: v1@15.1,7.203 15.638,6.666 15.638,6.766 16.085,7.214 16.747,7.214 ; U6.H10@16.747,7.026 16.747,7.214 ; U6.J10@16.747,7.376 16.747,7.214 ; v1@18.073,8.925 18.497,8.501 U6.K5@18.497,7.726 ; C24.1@19.745,8.508 20.103,8.508 v1(20.118,8.493) ; C24.1@19.796,8.467 19.796,8.17 19.897,8.068 U6.K1@19.897,7.726 ; v5(20.303,4.652) 21.088,3.868 C26.1@21.088,3.723 21.088,3.586 21.291,3.382 21.291,3.399 v1@21.216,3.474
  Top Layer w0.3: C27.1@15.636,3.15 15.636,2.812 v1(15.925,2.522)
  Top Layer w0.508: SB4.1@8.781,34.544 7.99,33.753 7.99,30.085 P2.1@9.119,28.956
  Mid Layer 1 w0.15: v5(19.197,4.926) 20.03,4.926 v5(20.303,4.652)
  Mid Layer 1 w0.2: v5(15.829,3.556) 16.83,4.558 17.224,4.558 17.447,4.781 v5(17.447,4.926)
  Mid Layer 2 w0.279: P2.1@9.119,28.956 9.119,27.249 11.159,25.209 11.159,21.403 12.076,20.487 12.076,10.906 13.135,9.847 15.567,9.847 15.849,10.129 16.917,10.129 17.476,9.57 17.476,8.89 ; v1@15.046,7.148 15.059,7.135 15.109,7.135 15.124,7.12 16.772,7.12 17.476,7.824 17.476,8.89 ; v1(20.118,8.493) 18.593,8.493 18.212,8.874 v1(17.946,8.874) 17.492,8.874 17.476,8.89
  Bottom Layer w0.3: v1@15.046,7.148 15.494,6.7 15.494,3.081 15.9,2.675 16.706,2.675 17.869,1.511 19.443,1.511 v1(21.291,3.358)
  other v1: 15.046,7.199
VDD_nRF91: C1.1 C2.1 C3.1 C65.1 C66.1 C67.1 FB1.1 P1.1 SB3.1 U1.22 | length 37.8
  Top Layer w0.3: v1(7.036,10.338) 7.812,9.562 C66.1@8.781,9.562 ; C66.1@8.806,9.562 9.28,9.562 9.345,9.627 9.606,9.627 C67.1@10.006,10.027 ; C67.1@10.456,9.827 U1.22@10.456,11.357
  Top Layer w0.5: v1(7.722,25.324) 7.442,25.324 6.934,24.816 6.934,24.027 9.6,24.027 FB1.1@10.045,23.582
  Top Layer w0.508: SB3.1@6.241,34.544 5.45,33.753 5.45,30.085 P1.1@6.579,28.956
  Mid Layer 2 w0.5: v1(7.722,25.324) 8.23,25.324
  Mid Layer 2 w0.508: P1.1@6.579,28.956 6.579,28.499 8.255,26.822 8.255,24.282 7.839,23.866 7.839,16.018 5.893,14.072 5.893,11.328 6.883,10.338 v1(7.036,10.338)
VDD_RF_FE: C6.2 C16.2 C17.2 C60.2 L2.1 R51.1 U2.4 U3.4 U4.2 U17.A1 | length 46.6
  Top Layer w0.2: v1(32.4,14.9) ccw(c32.478,14.978) 32.478,14.868 C60.2@33.198,14.868 33.2,14.869 L2.1@33.2,15.725
  Top Layer w0.254: C16.2@31.096,5.463 v1(31.101,5.469) U2.4@31.826,5.469 ; U4.2@35.4,10.27 35.4,10.6 36.5,11.7 v1(37.2,11.7)
  Mid Layer 2 w0.254: v3(34.849,14.808) 36.449,14.808 37.16,14.097 37.16,11.808 37.182,11.786 37.182,11.718 v1(37.2,11.7)
  Mid Layer 2 w0.33: v3(25.07,14.259) 25.349,13.98 25.349,11.252 26.162,10.439 28.502,10.439 31.956,6.986 31.956,5.784 31.64,5.469 v1(31.101,5.469) 31.096,5.463 v1(31.096,4.462)
  Bottom Layer w0.254: 17.684,19.58 U17.A1@17.684,20.5 ; U17.A1@17.7,20.5 18.21,20.5 18.237,20.473 18.342,20.473 R51.1@18.35,20.465 ; 17.809,19.58 20.132,17.258 22.072,17.258 v3(25.07,14.259) 25.746,14.935 34.722,14.935 v3(34.849,14.808) ; v1(31.096,4.462) 31.101,4.456 U3.4@31.826,4.456
VDD_RF_FE': R51.2 ST1.2 U17.A2 | length 4.3
  Bottom Layer w0.254: U17.A2@17.684,20.9 ST1.2@17.684,24.511 ; U17.A2@17.7,20.9 18.2,20.9 18.335,21.035 R51.2@18.35,21.035
VDD_SENSE: LD1.4 ST3.2 | length 21.5
  Mid Layer 2 w0.254: v3(19.431,25.603) 29.439,25.603 v3(29.972,25.07)
  Bottom Layer w0.254: ST3.2@18.872,25.603 v3(19.431,25.603) ; v3(29.972,25.07) 31.605,23.437 33.8,23.437 35.636,25.273 37.16,25.273 37.725,25.838 LD1.4@37.725,26.575
VID1: R26.1 U11.D2 | length 4.5
  Mid Layer 2 w0.125: v6(12.821,38.246) 12.898,38.246 13.814,37.33 13.814,35.385 v6(12.957,34.529)
VLI-ION: C50.2 P3.2 SB2.2 ST10.2 SW1.6 TP14.1 U11.D6 | length 34.6
  Top Layer w0.762: v1(12.7,46.7) TP14.1@14,48
  Mid Layer 2 w0.508: v3@7.112,34.06 10.111,34.06 P3.2@12.675,31.496
  Bottom Layer w0.3: C50.2@10.102,38.522 10.381,38.243 U11.D6@11.154,38.243
  Bottom Layer w0.5: 6.768,38.289 6.79,38.289 7.798,39.297 9.522,39.297 9.982,38.837 C50.2@9.982,38.481
  Bottom Layer w0.762: SW1.6@3.875,42.12 5.454,42.12 5.461,42.113 ; 7.112,33.68 7.112,33.685 v3(7.112,34.112) 7.112,37.945 6.768,38.289 5.461,39.596 5.461,42.113 ; v1(12.7,46.7) 11.06,45.06 10.262,45.06 9.458,44.256 6.056,44.256 5.461,43.661 5.461,42.113
VLi-Ion': J3.3 SW1.5 TP13.1 | length 13.7
  Top Layer w0.762: v1(3.886,40.564) 3.886,42.291 v1(6.858,45.263) 9.467,47.871 10.857,47.871 11,47.728 TP13.1@11,48
  Bottom Layer w0.762: v1@3.875,40.603 SW1.5@3.875,39.62 SW1.5@3.984,39.62 ; v1(6.858,45.263) 7.995,45.263 J3.3@8,45.258
VSYS: C51.2 R24.2 R25.2 R29.1 R30.1 R31.2 TP17.1 U11.E6 | length 24.4
  Top Layer w0.457: 12.04,37.506 v1@14.613,34.933 ; v1(14.605,34.925) 16.075,34.925 TP17.1@17,34
  Top Layer w0.508: v1(9.331,35.484) 9.331,37.201 v1(9.509,37.379) 9.62,37.49 12.04,37.49 12.04,37.506 13.599,39.065 v1@16.739,39.065
  Bottom Layer w0.203: C51.2@10.021,37.426 10.441,37.846 U11.E6@11.221,37.846
  Bottom Layer w0.254: v1(9.331,35.484) 9.976,34.839 11.682,34.839 ; R30.1@11.682,34.534 11.682,34.839 ; R29.1@11.682,35.144 11.682,34.839
  Bottom Layer w0.381: v1(9.509,37.379) C51.2@9.931,37.379
  Bottom Layer w0.508: R24.2@8.153,35.196 9.044,35.196 v1(9.331,35.484) ; R25.2@13.564,33.917 14.08,33.917 14.605,34.442 v1(14.605,34.925)
  other v1: 16.764,39.065
XC1: C18.1 U6.A1 X1.1 | length 4.7
  Top Layer w0.125: U6.A1@19.897,4.576 19.913,4.561 19.913,3.941 20.296,3.558 20.579,3.558 21.625,2.511 21.625,2.281 X1.1@21.934,1.972 21.984,1.972 22.346,2.334 22.346,2.384 22.42,2.458 C18.1@22.784,2.458
XC2: C19.1 U6.A2 X1.3 | length 4.9
  Top Layer w0.125: U6.A2@19.547,4.576 19.562,4.562 19.562,4.505 19.663,4.404 19.663,3.837 20.192,3.308 20.37,3.308 21.209,2.468 21.209,1.473 20.92,1.184 20.846,1.184 X1.3@20.484,0.822
XL1: C30.1 U6.B9 X2.1 | length 4.5
  Top Layer w0.125: v5(14.402,4.216) 14.471,4.216 14.983,4.728 X2.1@15.672,4.728
  Mid Layer 1 w0.125: v5(14.402,4.216) 14.402,4.218 15.109,4.926 v5(17.097,4.926)
XL2: C31.1 U6.B10 X2.2 | length 2.4
  Top Layer w0.125: C31.1@14.89,5.944 15.697,5.944 X2.2@15.742,5.899 ; X2.2@15.672,5.828 15.788,5.828 16.691,4.926 U6.B10@16.747,4.926 ; U6.B10@16.691,4.926 U6.B10@16.747,4.926
pads on no net: A1.0 A1.3 A1.4 Fid1.0 Fid2.0 Fid3.0 H1. H2. H3. J3.0 J4.C6 J5.0 J5.1 J5.3 J5.5 J6.4 J6.6@1.45,22 J6.6@1.45,28.6 P8.0 P8.6 P8.7 P8.8 SW1.0 SW1.1 SW2.0 U1.10 U1.51 U1.57 U1.64 U1.70 U1.71 U1.73 U1.104 U1.105 U1.106 U1.107 U1.108 U1.109 U1.110 U1.111 U1.112 U1.113 U1.114 U1.115 U1.116 U1.117 U1.118 U1.119 U1.120 U1.121 U1.122 U1.123 U1.126 U1.127 U2. U2.8 U2.9 U2.10 U3. U3.8 U3.9 U6.B4 U6.B5 U6.B6 U6.C5 U6.C6 U6.C7 U6.C8 U6.C10 U6.E3 U6.E10 U6.F3 U6.F9 U6.G3 U6.G10 U6.H4 U6.H5 U6.H6 U6.H7 U6.H9 U7.2 U7.3 U7.5 U7.10 U7.15 U8.2 U8.3 U8.5 U8.10 U8.15 U10.8 U12.9 U12.13 U13.5 U15.0 U15.2 U15.4 U15.5 U16.10

## Polygon pours and split planes (outlines as drawn)
AGND on Mid Layer 2 "Mid Layer 2-AGND" (solid, remove dead copper, pour order 0): 12.983,42.891 8.695,42.891 8.695,35.789 12.983,35.789
GND on Mid Layer 2 "Mid_Layer_2-GND" (solid, remove dead copper, pour order 4): 60.004,-4.572 -14.604,-4.572 -14.604,54.331 60.004,54.331
GND on Mid Layer 1 "Mid_Layer_1-GND" (solid, remove dead copper, pour order 3): 59.776,-4.724 -14.833,-4.724 -14.833,54.178 59.776,54.178
GND on Top Layer "Top_Layer-GND" (solid, remove dead copper, pour order 2): 59.395,-3.835 -15.214,-3.835 -15.214,55.067 59.395,55.067
GND on Bottom Layer "Bottom_Layer-GND" (solid, remove dead copper, pour order 1): 60.995,-3.988 -6.595,-3.988 -6.595,54.889 60.995,54.889

## Keep-outs
Top Layer:
  circle w0.1: c38.28,37.3 r2.5
Keep-Out Layer:
  circle w0.1: c50.8,19.6 r0.3
  circle w0.1: c50.8,18.6 r0.3
  circle w0.1: c50.8,17.6 r0.3
  circle w0.1: c0,17.6 r0.3
  circle w0.1: c0,18.6 r0.3
  circle w0.1: c0,19.6 r0.3
  circle w0.1: c24,50.5 r0.3
  circle w0.1: c25,50.5 r0.3
  circle w0.1: c26,50.5 r0.3
  circle w0.1: c25.997,0.1 r0.3
  circle w0.1: c24.997,0.1 r0.3
  circle w0.1: c23.997,0.1 r0.3
  lines w0.001: 20.7,28.2 cw(c20.7,28.7) 20.7,29.2 24.2,29.2 ccw(c24.2,29.7) 24.7,29.7 24.7,33.2 ccw(c24.2,33.2) 24.2,33.7 20.7,33.7 cw(c20.7,34.2) 20.7,34.7 24.2,34.7 cw(c24.2,33.2) 25.7,33.2 25.7,29.7 cw(c24.2,29.7) 24.2,28.2 20.7,28.2
  lines w0.1: 0,0.1 0,9.68 1.56,9.68 1.56,12.28 0,12.28 0,50.5 38.8,50.5 38.8,44.3 ccw(c44.3,44.3) 44.3,38.8 50.8,38.8 50.8,0.1 16,0.1 16,1.8 8,1.8 8,0.1 0,0.1

## Other copper
Top Layer:
  rectangle net GND: 17.347,5.526 18.947,6.776
  rectangle net GND: 18.747,5.276 18.947,5.726
  region net GND: 29.699,2.388 29.471,2.388 29.471,1.803 29.699,1.803
  rectangle net ANT_LTE: 45.872,0.5 46.558,1.5
  rectangle net GND: 25.483,1.803 25.711,2.388
  region net GND: 29.699,3.688 29.471,3.688 29.471,3.103 29.699,3.103
  region net GND: 20.228,5.626 20.375,5.479 20.375,5.214 19.959,5.214 19.821,5.352 19.821,5.626
  pour cut-out: 25.591,7.793 29.591,7.793 29.591,0.1 25.591,0.1 25.591,1.793
  pour cut-out: 18.479,1.883 18.932,1.883 18.932,1.68 18.881,1.68 18.475,1.68
  pour cut-out: 17.467,2.982 17.467,2.529 17.264,2.529 17.264,2.58 17.264,2.986
  pour cut-out: 36.254,9.369 36.254,7.236 35.048,7.236 35.048,9.369
  pour cut-out: 14.558,8.816 14.558,9.508 15.24,9.508 15.24,8.816
Mid Layer 1:
  pour cut-out: 25.591,7.793 29.591,7.793 29.591,0.1 25.591,0.1 25.591,1.793
  pour cut-out: 25.183,16.32 25.971,16.32 25.971,15.634 25.183,15.634
  pour cut-out: 25.183,19.32 25.971,19.32 25.971,18.634 25.183,18.634
  pour cut-out: 30.669,2.623 30.669,3.823 31.269,3.823 31.269,2.623
  pour cut-out: 31.854,2.059 30.654,2.059 30.654,2.659 31.854,2.659
  pour cut-out: 35.846,5.105 35.846,3.124 34.957,3.124 34.957,5.105
  pour cut-out: 32.387,2.68 32.387,1.48 31.787,1.48 31.787,2.68
  pour cut-out: 5.687,33.646 5.687,35.424 9.906,35.424 9.906,33.646
  pour cut-out: 27.138,14.577 27.138,17.377 30.038,17.377 30.038,14.577
  pour cut-out: 35.695,7.1 35.695,5.9 35.095,5.9 35.095,7.1
  pour cut-out: 36.074,9.369 36.074,7.236 35.236,7.236 35.236,9.369
  pour cut-out: 33.6,17.001 34.8,17.001 34.8,16.401 33.6,16.401
  pour cut-out: 31.598,17.001 32.798,17.001 32.798,16.401 31.598,16.401
  pour cut-out: 32.898,13.983 32.898,15.183 33.498,15.183 33.498,13.983
  pour cut-out: 33.666,17.191 33.666,15.209 32.777,15.209 32.777,17.191
  pour cut-out: 32.525,17.075 32.525,20.6 33.85,20.6 33.85,17.075
  pour cut-out: 35.585,10.055 35.585,9.674 35.209,9.674 35.209,10.055
  pour cut-out: 34.815,10.085 34.815,10.466 35.191,10.466 35.191,10.085
  pour cut-out: 34.98,5.958 36.961,5.958 36.961,5.069 34.98,5.069
Mid Layer 2:
  rectangle net AGND: 12.776,38.938 13.447,39.243
  region net GND: 13.184,39.497 13.184,38.73 13.357,38.557 13.792,38.557 13.818,38.583 13.818,39.497
  pour cut-out: 25.591,7.793 29.591,7.793 29.591,0.1 25.591,0.1 25.591,1.793
  pour cut-out: 17.424,12.048 23.749,12.048 23.749,10.033 17.424,10.033
  pour cut-out: 31.406,1.048 31.406,2.248 32.006,2.248 32.006,1.048
  pour cut-out: 34.813,1.632 34.813,2.832 35.413,2.832 35.413,1.632
  pour cut-out: 33.895,3.334 33.895,4.534 34.495,4.534 34.495,3.334
  pour cut-out: 30.796,3.029 30.796,4.229 31.396,4.229 31.396,3.029
  pour cut-out: 30.263,2.445 30.263,3.645 30.863,3.645 30.863,2.445
  pour cut-out: 31.468,1.627 30.268,1.627 30.268,2.227 31.468,2.227
  pour cut-out: 34.874,1.987 33.674,1.987 33.674,2.587 34.874,2.587
  pour cut-out: 35.074,2.796 33.874,2.796 33.874,3.396 35.074,3.396
  pour cut-out: 6.248,32.182 6.248,33.96 10.033,33.96 10.033,32.182
  pour cut-out: 14.199,15.672 15.469,15.672 15.469,14.351 14.199,14.351
Bottom Layer:
  region net 1V8: 17.126,38.502 15.729,38.502 15.729,35.581 17.126,35.581
  region net AGND: 12.508,36.873 11.84,36.873 11.84,35.931 12.508,35.931
  rectangle net 3V3: 16.891,24.841 18.542,27
  region net GND: 15.225,36.35 13.719,36.35 13.719,35.563 15.225,35.563
  region net GND: 13.221,39.37 13.259,39.37 14.046,40.157 15.037,40.157 15.037,40.869 13.106,40.869 13.106,39.446 13.132,39.421
  region net GND: 14.46,12.032 14.46,12.53 14.641,12.53 14.834,12.337 14.834,12.217 14.576,11.96
  pour cut-out: 25.591,7.793 29.591,7.793 29.591,0.1 25.591,0.1 25.591,1.793
  pour cut-out: 16.956,39.256 16.956,38.672 16.677,38.672 16.677,39.256
  pour cut-out: 26.234,49.807 29.99,49.807 29.99,48.253 26.222,48.253
  pour cut-out: 26.234,44.307 29.99,44.307 29.99,42.753 26.222,42.753
Multi-Layer:
  pour cut-out: 20,34.2 20,28.7 24.917,28.7 24.917,34.2

## Silkscreen, mask and mechanical layers (free items; w line width, h text height)
Top Overlay:
  drawing of 57 lines, arcs and shapes, not listed
  text "'.PCBNumber'" at 37.109,49.779 h2.03 r270
  text "'.PCBRevision'" at 36.079,49.696 h0.51 r270
  text "SIM" at 17.221,47.955 h1.78
  text "X" at 34.242,43.947 h1.37
  text "Thingy:91" at 3.302,43.637 h2.41 r270
  text "ON" at 0.254,41.986 h1.78 r270
  text "Y" at 37.606,40.533 h1.37
  text "OFF" at 0.254,39.065 h1.78 r270
  text "4D" at 26.375,33.8 h1.5
  text "3D" at 28.375,33.8 h1.5
  text "2D" at 30.375,33.8 h1.5
  text "1D" at 32.375,33.8 h1.5
  text "1V8" at 34.085,33.8 h1.5
  text "+" at 20.259,31.919 h1.02 r90
  text "IN" at 4.293,31.877 h1.27 r270
  text "OUT" at 4.293,29.87 h1.27 r270
  text "GND" at 19.279,29.87 h1.27 r270
  text "4S" at 26.375,28.5 h1.5
  text "3S" at 28.375,28.5 h1.5
  text "2S" at 30.375,28.5 h1.5
  text "1S" at 32.375,28.5 h1.5
  text "GND" at 33.834,28.5 h1.5
  text "nRF / 91" at 5.341,27.432 h1.78 r270
  text "nRF / 52" at 7.881,27.432 h1.78 r270
  text "Li-po" at 12.167,27.432 h1.78 r270
  text "1V8" at 14.707,27.432 h1.78 r270
  text "3V3" at 17.247,27.432 h1.78 r270
  text "nRF91" at 0.6,21.441 h1.34 r270
  text "SWD / SELECT" at 2.575,20.825 h1.34
  text "GPS" at 31.9,20.8 h1.78
  text "LTE" at 27.432,17.526 h1.78
  text "nRF52" at 0.6,15.455 h1.34 r270
Bottom Overlay:
  drawing of 838 lines, arcs and shapes, not listed
  text "Power" at 4.572,44.374 h2.03
  text "ON" at 4.805,40.818 h1.78 r270
  text "OFF" at 4.805,36.576 h1.78 r270
Board Outline:
  lines w0.15: 0,0.1 0,9.68 1.56,9.68 1.56,12.28 0,12.28 0,50.5 38.8,50.5 38.8,44.3 ccw(c44.3,44.3) 44.3,38.8 50.8,38.8 50.8,0.1 16,0.1 16,1.8 8,1.8 8,0.1 0,0.1
  lines w0.152: 20.7,28.2 cw(c20.7,28.7) 20.7,29.2 24.2,29.2 ccw(c24.2,29.7) 24.7,29.7 24.7,33.2 ccw(c24.2,33.2) 24.2,33.7 20.7,33.7 cw(c20.7,34.2) 20.7,34.7 24.2,34.7 cw(c24.2,33.2) 25.7,33.2 25.7,29.7 cw(c24.2,29.7) 24.2,28.2 20.7,28.2
Board Other:
  drawing of 2143 lines, arcs and shapes, not listed
Dimension:
  circle w0.1: c38.28,37.3 r1.55
Top Assembly:
  drawing of 43 lines, arcs and shapes, not listed
Bottom Assembly:
  drawing of 874 lines, arcs and shapes, not listed
Top Impedance Info:
  lines w0.146: 19.897,5.976 20.47,5.976 ; 21.046,5.976 21.313,5.976 21.562,5.976 ; 22.132,5.976 22.723,5.976 cw(c22.723,5.425) 23.275,5.425 ; 23.525,3.246 23.525,4.625 ; 23.574,3.206 24.096,3.206 ; 24.697,3.175 25.873,3.175 ; 25.576,15.977 27.429,15.977 ; 25.576,18.977 31.546,18.977 cw(c31.546,17.323) 33.2,17.323 33.2,10.419 ; 29.676,15.977 cw(c29.676,14.737) 30.916,14.737 30.916,10.288 ccw(c32.944,10.288) 31.51,8.854 32.29,8.074 cw(c31.37,7.154) 32.671,7.154 32.671,6.989 ; 30.969,2.359 30.831,2.359 cw(c30.831,3.019) 30.171,3.019 30.171,7.098 cw(c30.868,7.098) 30.868,7.795 31.465,7.795 cw(c31.465,6.989) 32.271,6.989 ; 30.969,3.508 cw(c30.969,3.889) 30.588,3.889 30.588,5.89 cw(c31.067,5.89) 31.067,6.369 31.826,6.369 ; 31.018,3.556 31.608,3.556 ; 31.172,5.919 31.826,5.919 ; 31.172,6.819 31.826,6.819 ; 31.539,2.359 32.098,2.359 32.112,2.373 32.112,2.664 ; 33.071,6.989 33.071,7.433 cw(c33.458,7.433) 33.458,7.82 ; 33.516,6.819 33.734,6.819 ; 33.734,3.556 34.195,3.556 ; 34.195,4.587 34.195,6.015 ; 34.195,6.585 34.195,7.37 ; 34.2,8.833 34.2,9.743 ; 37.77,0.991 38.577,0.991
  text "50ohm impedance top" at 29.06,-1.778 h0.89
Bottom Impedance Info:
  lines w0.146: 30.583,1.927 30.346,2.163 ; 31.062,3.33 30.563,3.33 ; 31.153,1.927 31.7,1.927 31.706,1.933 ; 31.172,5.944 ccw(c31.172,5.334) 30.563,5.334 30.563,3.33 ; 31.172,6.819 30.922,6.819 ccw(c30.922,6.067) 30.171,6.067 30.171,2.588 ccw(c30.77,2.588) 30.346,2.164 ; 31.319,4.006 31.826,4.006 ; 31.608,3.556 31.826,3.556 ; 31.717,1.96 31.717,2.997 ; 32.112,2.664 32.271,2.823 32.271,2.936 ; 32.671,2.936 32.671,2.736 ccw(c34.417,2.736) 34.417,0.991 37.77,0.991 ; 33.071,2.936 ccw(c33.721,2.936) 33.721,2.287 33.989,2.287 ; 33.458,7.82 34.66,7.82 cw(c34.66,7.161) 35.318,7.161 35.318,2.78 cw(c35.075,2.78) 35.075,2.537 ; 33.516,3.106 34.179,3.106 34.189,3.096 ; 33.516,3.556 33.734,3.556 ; 33.734,6.819 33.882,6.671 cw(c33.126,5.915) 34.195,5.915 34.195,4.219 ; 34.195,3.09 34.189,3.096 ; 34.195,3.649 34.189,3.643 34.189,3.096 ; 34.559,2.287 ccw(c34.559,3.067) 35.111,2.515 ; 30.346,2.164 30.346,2.163 ; 30.563,3.33 30.563,3.33 ; 34.189,3.096 34.189,3.096
  text "50ohm impedance bottom" at 29.06,-1.778 h0.89
Top Placement:
  circle w0.1: c38.28,37.3 r2.5
  rectangle: 23,0.1 34,1.7
  lines w0.1: 28.27,0.2 28.27,28.2 ; 34.67,0.2 34.67,28.2 ; 35.38,0.2 35.38,28.2 ; 36.25,4.826 36.25,32.826
  text "H=2.0mm" at 27.6,0 h0.89 r270
  text "H=1.1mm" at 33.75,0 h0.89 r270
  text "H=1.0mm" at 34.96,0 h0.89 r270
Via Capping Top:
  text "Capped vias top" at 29.21,-1.778 h0.89
Bottom Via Capping:
  text "Capped vias bottom" at 29.21,-1.778 h0.89

## Dimensions
0,0.1 to 1.56,12.28 on Dimension
0,0.1 to 1.56,9.68 on Dimension
38.28,37.3 to 38.8,50.5 on Dimension
38.28,37.3 to 50.8,38.8 on Dimension
44.3,44.3 to 43.18,43.18 on Dimension
38.8,44.3 to 0,50.5 on Dimension
50.8,0.1 to 50.8,38.8 on Dimension
0,0.1 to 50.8,0.1 on Dimension
0,0.1 to 0,50.5 on Dimension